# Altium PCB pcb_lna.PcbDoc
Units mil, origin at the board's own origin, x right, y up, seen from the top; angles counter-clockwise.
Board outline 1181.1 x 620.08 mil, 2 copper layers (Top Layer, Bottom Layer); 17 components, 11 nets, 41 pads, 10 vias.
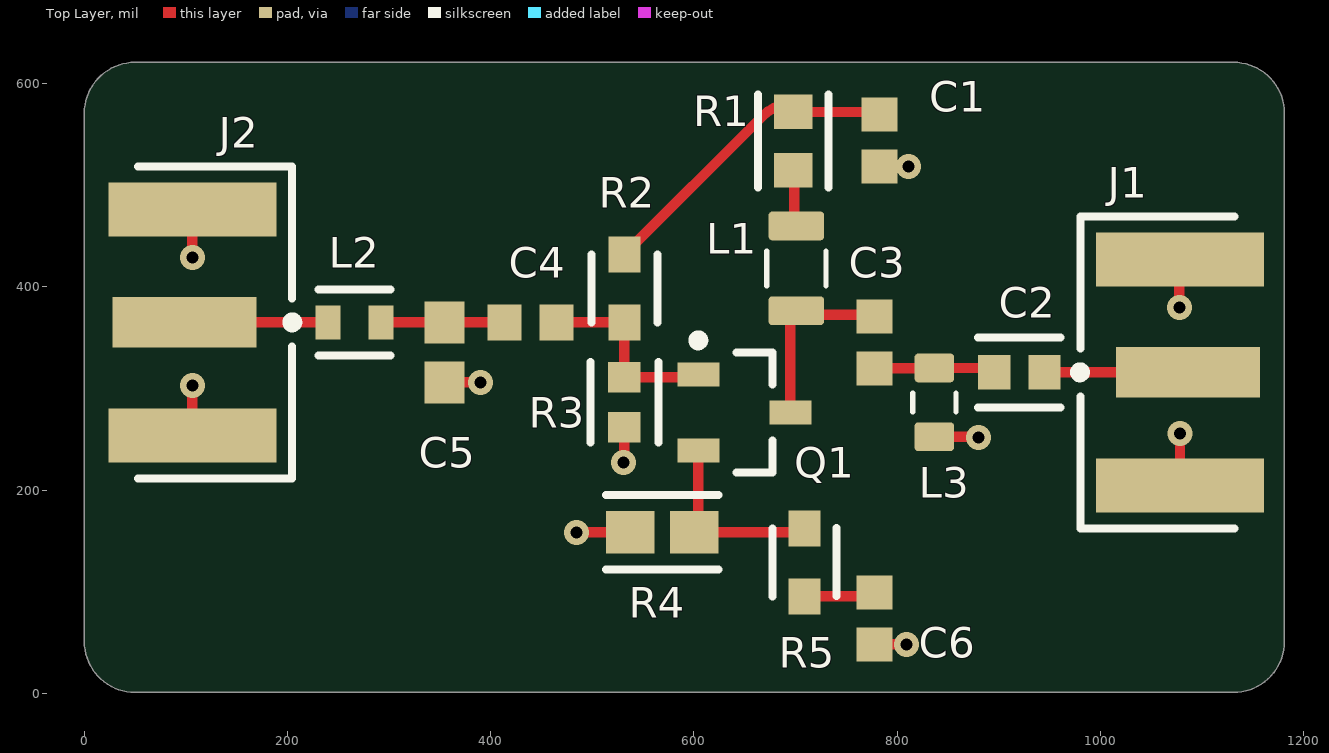
[diagram p0: Top Layer view]
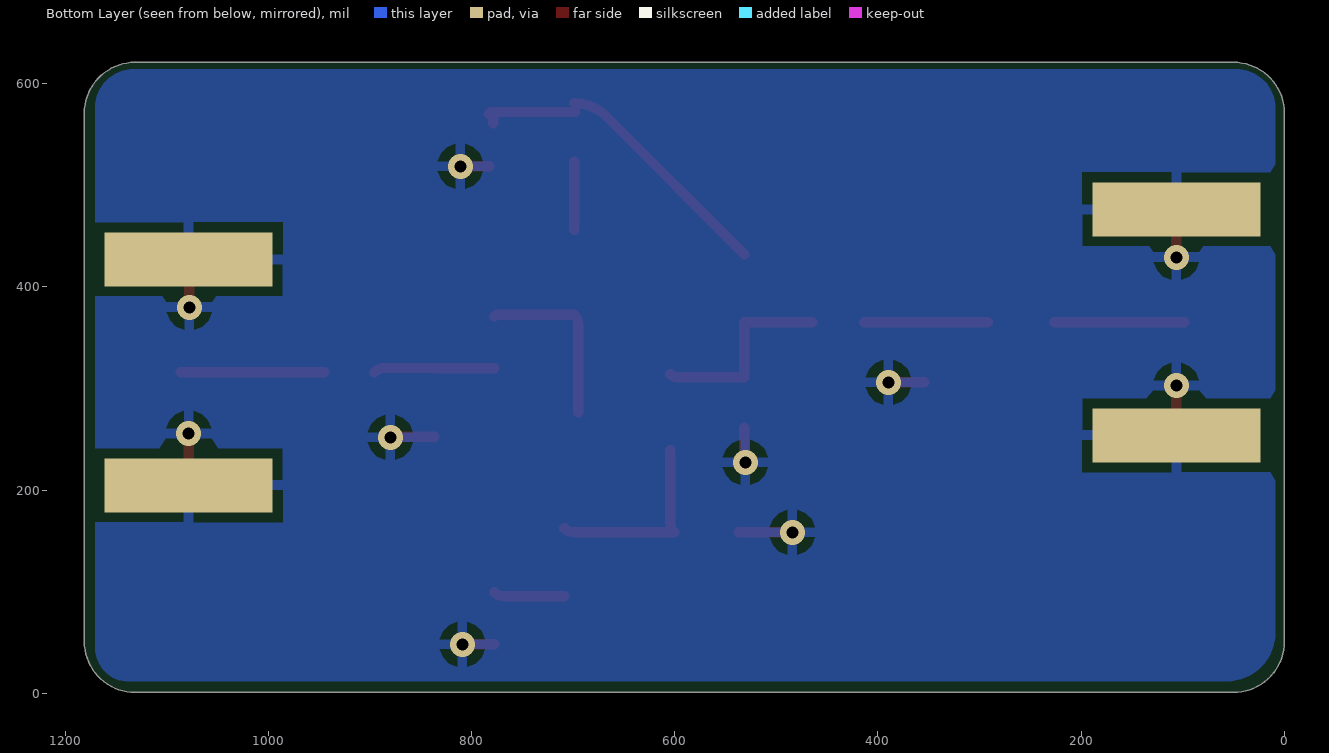
[diagram p1: Bottom Layer view, seen from below]
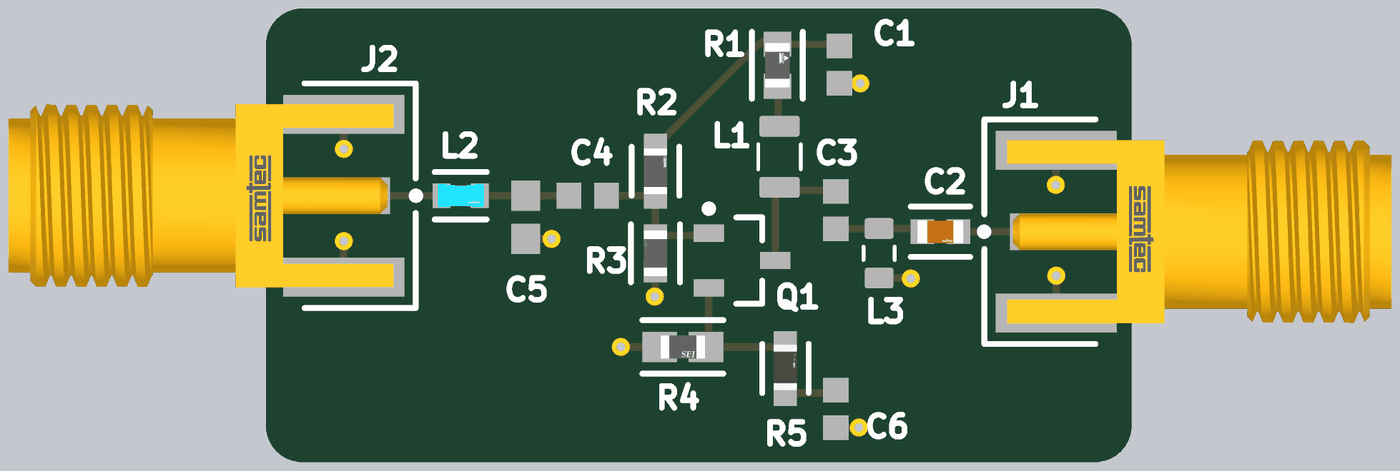
[diagram p2: 3D render of the assembled board from above, using the file's embedded part models]

## Layer stack, top to bottom
Top Solder: solder mask 0.4, Solder Resist, Dk 3.5
Top Layer: signal copper 1.4
Dielectric 1: dielectric 12.6, FR-4, Dk 4.8
Bottom Layer: signal copper 1.4
Bottom Solder: solder mask 0.4, Solder Resist, Dk 3.5

## Board outline
0,50.98 0,571.06 cw(c50,571.06) 50,621.06 1131.1,621.06 cw(c1131.1,571.06) 1181.1,571.06 1181.1,50.98 cw(c1131.1,50.98) 1131.1,0.98 50,0.98 cw(c50,50.98)

## Design rules (kind name [scope] priority, off if disabled: settings)
Clearance [All] p1: gap=10 ignorepadtopadclearanceinfootprint=FALSE
PolygonConnect [All] p1: connectstyle=Relief reliefconductorwidth=10 reliefentries=4 polygonreliefangle="90 Angle" airgapwidth=10
RoutingVias [All] p1: holewidth=28 width=50 viastyle="Through Hole" minholewidth=28 minwidth=50 maxholewidth=28 maxwidth=50
SolderMaskExpansion [All] p1: expansion=0 istentingtop=FALSE
SupplyNets "Schematic Supply Nets_1" [InNet('GND')] p1: voltage=0.000
SupplyNets "Schematic Supply Nets" [InNet('+10V')] p2: voltage=0.000
Width [All] p1: maxlimit=10 minlimit=10 preferedwidth=10
30 further rules are at their usual default settings.

## Components (designator, comment, footprint, x,y, rotation, side; value= is the part's Value field where it differs from the comment)
C1 "06035A100J4T2A" CAPC1608X90X35LL15T15 782.48,544.29 r90 top
C2 "GQM1875C2ER20BB12D" FP-GQM187-0_15-IPC_C 920.31,315.94 r0 top
C3 "06035A100J4T2A" CAPC1608X90X35LL15T15 777.56,345.47 r90 top
C4 "06035A100J4T2A" CAPC1608X90X35LL15T15 438.98,365.16 r0 top
C5 "06035A1R5BAT2A" CAPC1608X90X35NL15T15 354.33,335.63 r90 top
C6 "06035A201FAT2A" CAPC1608X90X35LL15T15 777.56,73.82 r90 top
J1 "SMA-J-P-H-ST-EM1" FP-SMA-J-P-H-ST-EM1-MFG 1348.43,315.94 r90 top
J2 "SMA-J-P-H-ST-EM1" FP-SMA-J-P-H-ST-EM1-MFG -163.78,365.16 r270 top
L1 "0805L" INDC2012X60N 700.79,418.31 r90 top value=1.8µH
L2 "LQW18AN82NJ00D" FP-LQW18AN_00-MFG 265.75,365.16 r0 top
L3 "0603_820nL" INDC1608X60N 836.61,286.42 r90 top value=820nH
Q1 "BFR93A" INF-SOT23_N 649.61,276.57 r0 top
R1 "MCT0603MD4990DP500" FP-MCT0603-IPC_B 697.83,543.48 r90 top
R2 "AC0603FR-077K15L" FP-AC0603-MFG 531.5,398.62 r90 top
R3 "CR0603-FX-2101ELF" FP-CR0603-IPC_C 531.5,286.42 r90 top
R4 "RMCF0603FG124R" FP-RMCF0603-IPC_A 568.86,158.46 r0 top
R5 "RT0603BRB0749R9L" FP-RT0603-MFG 708.66,128.94 r90 top value=49.9Ω

## Footprints (in the part's own frame and the unit in brackets; to place one, negate y for a bottom-side part, rotate by r counter-clockwise, add the part's x,y. Pads: shape width x height; smd on the part's side, far side on the other; paste and mask are expansions set on the pad)
CAPC1608X90X35LL15T15 [mm] "Chip Capacitor, 2-Leads, Body 1.60x0.81mm, IPC High Density"
  rect 0.85x0.9 smd: 1(-0.65,0) 2(0.65,0)
  body extent -0.88,-0.48 0.87,0.48, height 0.9
CAPC1608X90X35NL15T15 [mm] "Chip Capacitor, 2-Leads, Body 1.60x0.81mm, IPC Medium Density"
  rect 1.05x1 smd: 1(-0.75,0) 2(0.75,0)
  body extent -0.88,-0.48 0.87,0.48, height 0.9
FP-AC0603-MFG [mm]
  rect 0.9x0.8 smd paste+0 mask+0: 1(-0.85,0) 2(0.85,0)
  silkscreen extent -0.85,-0.82 0.85,0.82, body extent -1.4,-0.55 1.4,0.55, height 0.25
FP-CR0603-IPC_C [mil]
  rect 29.85x31.97 smd paste+0 mask+0: 1(-24.68,0) 2(24.68,0)
  silkscreen extent -40,-33 40,33, body extent -44,-22 44,22, height 10
FP-GQM187-0_15-IPC_C [mil]
  rect 31.75x33.79 smd paste+0 mask+0: 1(-24.64,0) 2(24.64,0)
  silkscreen extent -41,-34 41,34, body extent -44,-23 44,23, height 10
FP-LQW18AN_00-MFG [mm]
  rect 0.625x0.85 smd paste+0 mask+0: 1(-0.663,0) 2(0.663,0)
  silkscreen extent -0.9,-0.82 0.9,0.82, body extent -1.07,-0.6 1.07,0.6, height 0.25
FP-MCT0603-IPC_B [mil]
  rect 34x37.88 smd paste+0 mask+0: 1(-28.72,0) 2(28.72,0)
  silkscreen extent -46,-35 46,35, body extent -56,-29 56,29, height 10
FP-RMCF0603-IPC_A [mil]
  rect 47.48x41.66 smd paste+0 mask+0: 1(-31.54,0) 2(31.54,0)
  silkscreen extent -55,-37 55,37, body extent -75,-41 75,41, height 10
FP-RT0603-MFG [mm]
  rect 0.9x0.8 smd paste+0 mask+0: 1(-0.85,0) 2(0.85,0)
  silkscreen extent -0.85,-0.81 0.86,0.8, body extent -1.4,-0.55 1.4,0.55, height 0.25
FP-SMA-J-P-H-ST-EM1-MFG [mm]
  rect 1.27x3.6 smd paste+0 mask+0: 1(0,6.66)
  rect 1.35x4.2 smd paste+0 mask+0: 2(-2.825,6.86) 3(2.825,6.86)
  rect 1.35x4.2 smd far side paste+0 mask+0: 4(-2.825,6.86) 5(2.825,6.86)
  silkscreen extent -3.9,5.5 3.9,9.48, body extent -3.6,-4.92 3.6,9.06, height 0.25
INDC1608X60N [mm] "Chip Inductor, 2-Leads, Body 1.60x0.85mm, IPC Medium Density"
  rrect25% 0.72x0.99 smd: 1(-0.86,0) 2(0.86,0)
  silkscreen extent -0.24,-0.54 0.24,0.54, body extent -0.85,-0.48 0.85,0.48, height 0.6
INDC2012X60N [mm] "Chip Inductor, 2-Leads, Body 2.00x1.25mm, IPC Medium Density"
  rrect25% 0.72x1.39 smd: 1(-1.06,0) 2(1.06,0)
  silkscreen extent -0.44,-0.74 0.44,0.74, body extent -1.05,-0.67 1.05,0.67, height 0.6
INF-SOT23_N [mm] "SOT23, 3-Leads, Body 2.9x1.3 mm, Pitch 0.95 mm, IPC Medium Density"
  rect 1.05x0.6 smd: 1(-1.15,0.95) 2(-1.15,-0.95) 3(1.15,0)
  silkscreen extent -1.27,-1.5 0.7,1.92, body extent -0.7,-1.5 0.7,1.5, height 1.1

## Part data
C1 C3 C4: library part CMP-2006-04574-1, Manufacturer="AVX Interconnect / Elco", Part Number=06035A100J4T2A
C2: library part CMP-06035-025553-1, "Ceramic Capacitor 0.2pF ±0.1pF 250VDC C0G 0603 Paper T/R", Capacitance=0.2pF, Case Code (Imperial)=0603, Case Code (Metric)=1608, Dielectric=C0G, Max Operating Temperature=125°C, Min Operating Temperature=-55°C, Package Quantity=4000, Voltage Rating=250V, Case/Package=0603, Depth=0.8mm, Height=0.7mm, Length=1.6mm, Mount="Surface Mount", Packaging="Tape and Reel", Radiation Hardening=No, Termination=SMD/SMT, Thickness=0.031inch, Voltage Rating (DC)=250V, Width=0.031inch
C5: library part CMP-2006-04261-1, Manufacturer="AVX Interconnect / Elco", Part Number=06035A1R5BAT2A
C6: library part CMP-2006-04266-1, Manufacturer="AVX Interconnect / Elco", Part Number=06035A201FAT2A
J1 J2: library part CMP-02754-000006-1, "CONN SMA JACK STR 50OHM EDGE MNT", Case/Package=SMA, Dielectric Material=PTFE, Housing Color=Gold, Max Frequency=6GHz, Max Operating Temperature=125°C, Min Operating Temperature=-65°C, Package Quantity=1, Voltage Rating=335V, Body Material=Brass, Body Plating=Gold, Center Contact Plating=Gold, Connector Type=SMA, Contact Material=Copper, Contact Plating=Gold, Depth=13.33mm, Fastening Type=Threaded, Impedance=50R, Insulation Material=Polytetrafluoroethylene, Length=6.35mm, Mount=Edge, Orientation=Straight, Packaging=Tray, Radiation Hardening=No, RoHS Compliant=Yes, Series=SMA, Termination=Solder
L1: library part CMP-006-00021-1, "Surface mount 1.8 uH inductor in 0805 package"
L2: library part CMP-06042-002805-1, "Wire Wound RF Inductor 82nH ±5% 250mA 0.6Ω 0603 (1608)", Case Code (Imperial)=0603, Case Code (Metric)=1608, Current=160mA, Current Rating=250mA, DC Resistance (DCR)=600mR, Inductance=82nH, Max Operating Temperature=125°C, Min Operating Temperature=-55°C, Package Quantity=4000, Resistor Type=Wirewound, Self Resonant Frequency=2GHz, Test Frequency=100MHz, Tolerance=5%, Case/Package=0603, Core Material=Non-Magnetic, DC Current=250mA, Depth=1mm, Height=0.8mm, Height - Seated (Max)=0.039inch, Lead Free="Lead Free", Length=1.6mm, Max DC Current=250mA, Military Standard=Not, Mount="Surface Mount", Packaging="Tape and Reel", Q Factor=34, Radiation Hardening=No, Shielding=Unshielded, Termination=SMD/SMT, Weight=0.000106oz, Width=0.031inch
L3: library part CMP-006-00022-1, "Surface mount 820nH inductor in 0603 package"
Q1: library part CMP-1189-00004-1, "NPN Silicon RF Transistor, 12 V VCEO, 90 mA IC, 14.5 dB Gmax, SOT23, Green", Manufacturer=Infineon, ComponentLink1Description="Manufacturer URL", ComponentLink1URL=http://www.infineon.com/, ComponentLink2Description=Datasheet, ComponentLink2URL=http://www.infineon.com/dgdl/bfr93a.pdf?folderId=db3a30431400ef68011425b1354605c1&fileId=db3a30431400ef6801142702189806ae&location=en.Products.RF.RF_Transistors_.High_Linearity_Si-_and_SiGe_C-Transistors_for_use_up_to_6_GHz.DATASHEET.bfr93a.pdf, ComponentLink3Description="Package Specification", ComponentLink3URL=http://www.infineon.com/dgdl/SOT23-Package_Overview.pdf?folderId=db3a30431936bc4b0119532290053c66&fileId=db3a30431936bc4b0119533468123c85, DatasheetVersion=Aug-2012, Gmax (typ)="14.5 dB", Green=yes, Group="For low frequencies, e.g. VHF/UHF", IC (max)="90 mA", Mounting Technology="Surface Mount", NFmin (typ)="1.5 dB", PackageDescription="3-Pin Small Outline Transistor Package, 1.3 x 2.9 mm Body, 0.95 mm Pitch", PackageReference=SOT23, PartNumber=BFR93A, Ptot (max)=300.0mW, VCEO (max)="12 V"
R1: library part CMP-02407-004071-1, "RES SMD 100 OHM 1% 1/8W 0603", Case Code (Imperial)=0603, Case Code (Metric)=1608, Max Operating Temperature=175°C, Max Power Dissipation=150mW, Min Operating Temperature=-55°C, Package Quantity=1, Power Rating=125mW, Resistance=499R, Temperature Coefficient=25ppm/°C, Tolerance=0.5%, Voltage Rating=75V, Case/Package=0603, Composition="Thin Film", Features="Automotive AEC-Q200", Height=0.022inch, Length=0.061inch, Number of Terminations=2, Packaging="Tape and Reel", Termination=SMD/SMT, Weight=6.7E-05oz, Width=0.85mm
R2: library part CMP-03412-024834-2, "RES 7.15KΩ 1.00% 0.1W 0603", Case Code (Imperial)=0603, Case Code (Metric)=1608, Max Operating Temperature=155°C, Max Power Dissipation=100mW, Min Operating Temperature=-55°C, Resistance=7.15kR, Resistor Type="Thick Film", Temperature Coefficient=100ppm/°C, Tolerance=1%, Voltage Rating=50V, Case/Package=0603, Features="Moisture Resistant", Height=0.022inch, Length=0.063inch, Number of Terminations=2, Packaging="Tape and Reel", Power Rating=100mW, RoHS Compliant=Yes, Series=AC, Termination=SMD/SMT, Weight=7.1E-05oz, Width=0.8mm
R3: library part CMP-07231-004603-1, "Thick Film Chip Resistors 0603 2.1kΩ 0.1W 1% 100ppm/°C", Case Code (Imperial)=0603, Case Code (Metric)=1608, Max Operating Temperature=155°C, Max Power Dissipation=100mW, Min Operating Temperature=-55°C, Package Quantity=5000, Resistance=2.1kR, Temperature Coefficient=100ppm/°C, Tolerance=1%, Voltage Rating=50V, Case/Package=0603, Composition="Thick Film", Contact Plating=Tin, Depth=0.8mm, Features="Moisture Resistant", Height=0.022inch, Length=1.6mm, Military Standard=Not, Mount="Surface Mount", Number of Terminations=2, Packaging="Tape and Reel", Power Rating=100mW, Radiation Hardening=No, Termination=SMD/SMT, Thickness=457um, Width=0.031inch
R4: library part CMP-26527-005953-1, "124Ω ±1% 0.1W 0603 Thick Film Chip Resistor AEC-Q200 compliant", Case Code (Imperial)=0603, Case Code (Metric)=1608, Max Operating Temperature=155°C, Max Power Dissipation=100mW, Min Operating Temperature=-55°C, Package Quantity=10000, Resistance=124R, Resistor Type="Thick Film", Temperature Coefficient=100ppm/°C, Tolerance=1%, Case/Package=0603, Features="Automotive AEC-Q200", Height=0.022inch, Length=0.061inch, Mount="Surface Mount", Number of Terminations=2, Packaging="Tape and Reel", RoHS Compliant=Yes, Series=RMCF, Width=0.031inch
R5: library part CMP-03412-023636-1, "RES SMD 49.9 OHM 0.1% 1/10W 0603", Manufacturer=Yageo, Package=RT0603, Power Rating=0.1W, Resistance=49.9Ω, Temperature="-55°C to +155°C", Temperature Coefficient="10 ppm/°C", Temperature Range High=+155°C, Temperature Range Low=-55°C, Tolerance=0.001, Voltage Rating=75V, Automotive=No, Category=Res, ComponentLink2Description=Datasheet, ComponentLink2URL=http://www.yageo.com/documents/recent/PYu-RT_1-to-0.01_RoHS_L_9.pdf, Composition="Thin Film", Device Class L1="Passive Components", Device Class L2=Resistors, Device Class L3="Chip SMD Resistors", Digikey Description="RES SMD 49.9 OHM 0.1% 1/10W 0603", Footprint Url=http://www.yageo.com/exep/pages/download/literatures/PYu-R_Mount_10.pdf, Height=0.55mm, Ipc Land Pattern Name=RESC16080X45, Lead Free=Yes, Manufacturer Part Number=RT0603BRB0749R9L, Octopart=https://octopart.com/rt0603brb0749r9l-yageo-71393647, RoHS=TRUE, Series=RT

## Via types
v1: diameter 24.56, hole 11.81, Top Layer to Bottom Layer, 10 vias

## Nets (pads, with @x,y where several pads share a name; then routed paths per layer and width w, separated by ;. In a path a pad name is that pad's centre, name@x,y a point inside that pad or via, vN(x,y) a via of type N, cw(c..) or ccw(c..) an arc to the next point about the centre after c; other vN are vias at no path point)
+10V: C1.2 R1.2 R2.2 | length 324.1
  Top Layer w10: R2.2 667.19,567.78 cw(c698.82,536.15) R1.2@698.82,580.88 ; R1.2 780.17,572.2 cw(c780.17,569.88) C1.2 ccw(c782.48,565.94) 778.54,565.94 C1.2@778.54,561.02
GND: C1.1 C5.1 C6.1 J1.2 J1.3 J1.4 J1.5 J2.2 J2.3 J2.4 J2.5 L3.1 R3.1 R4.1 | length 429.8
  Top Layer w10: J2.3 v1(106.3,303.15) ; v1(106.3,429.13) J2.2 ; C5.1 v1(389.76,306.1) ; v1@481.3,155.51 cw(c484.25,155.51) v1(484.25,158.46) R4.1 ; v1(530.51,227.36) ccw(c530.51,228.35) 531.5,228.35 R3.1 ; C6.1 v1(809.06,48.23) ; C1.1 v1(811.02,518.7) v1@812.99,518.7 ; L3.1 879.92,252.56 v1(879.92,251.97) ; v1(1077.76,379.92) 1077.76,427.17 J1.3 ; J1.2 v1(1078.35,255.91) v1@1078.74,255.91
NetC2_1: C2.1 C3.1 L3.2 | length 119.4
  Top Layer w10: C3.1 835.66,319.88 ccw(c835.66,321.23) L3.2 885.21,320.28 cw(c885.21,305.49) C2.1
NetC2_2: C2.2 J1.1 | length 141.3
  Top Layer w10: C2.2 J1.1
NetC3_2: C3.2 L1.1 Q1.3 | length 176.3
  Top Layer w10: Q1.3 694.88,363.13 cw(c708.32,363.13) 698.82,372.64 773.76,372.64 cw(c773.76,367.26) C3.2
NetC4_1: C4.1 C5.2 L2.2 | length 121.6
  Top Layer w10: L2.2 C5.2 C4.1
NetC4_2: C4.2 Q1.1 R2.1 R3.2 | length 194.6
  Top Layer w10: C4.2 R2.1 R3.2 597.39,311.1 ccw(c597.39,320.92) Q1.1
NetC6_2: C6.2 R5.1 | length 70
  Top Layer w10: R5.1 768.05,95.47 ccw(c768.05,108.91) C6.2
NetJ2_1: J2.1 L2.1 | length 128
  Top Layer w10: J2.1 226.38,365.16
NetL1_2: L1.2 R1.1 | length 67.3
  Top Layer w10: L1.2@698.82,456.1 R1.1@698.82,523.45
NetQ1_2: Q1.2 R4.2 R5.2 | length 191.1
  Top Layer w10: Q1.2 604.33,167.97 cw(c590.89,167.97) R4.2 699.16,158.46 ccw(c699.16,171.91) R5.2

## Polygon pours and split planes (outlines as drawn)
GND on Bottom Layer "GND_L02_P007" (solid, pour order 7): 8.86,72.83 8.86,575.79 cw(c47.24,575.79) 47.24,614.17 1132.87,614.17 cw(c1132.87,576.77) 1170.28,576.77 1170.28,44.29 cw(c1137.8,44.29) 1137.8,11.81 57.09,11.81 cw(c57.09,60.04) 8.86,60.04 8.86,76.77 ccw(c7.87,76.77) 7.87,77.76

## Silkscreen, mask and mechanical layers (free items; w line width, h text height)
Mechanical 1:
  lines w10: 0,50.98 ccw(c50,50.98) 50,0.98 1131.1,0.98 ccw(c1131.1,50.98) 1181.1,50.98 1181.1,571.06 ccw(c1131.1,571.06) 1131.1,621.06 50,621.06 ccw(c50,571.06) 0,571.06 0,542.32 0,50.98